# Altium PCB Z80 Card for Commodore C64.PcbDoc
Units mm, origin at the board's own origin, x right, y up, seen from the top; angles counter-clockwise.
Board outline 58.01 x 82.64 mm, 2 copper layers (Top Layer, Bottom Layer), stack 1.569 mm thick; 27 components, 81 nets, 239 pads, 91 vias.
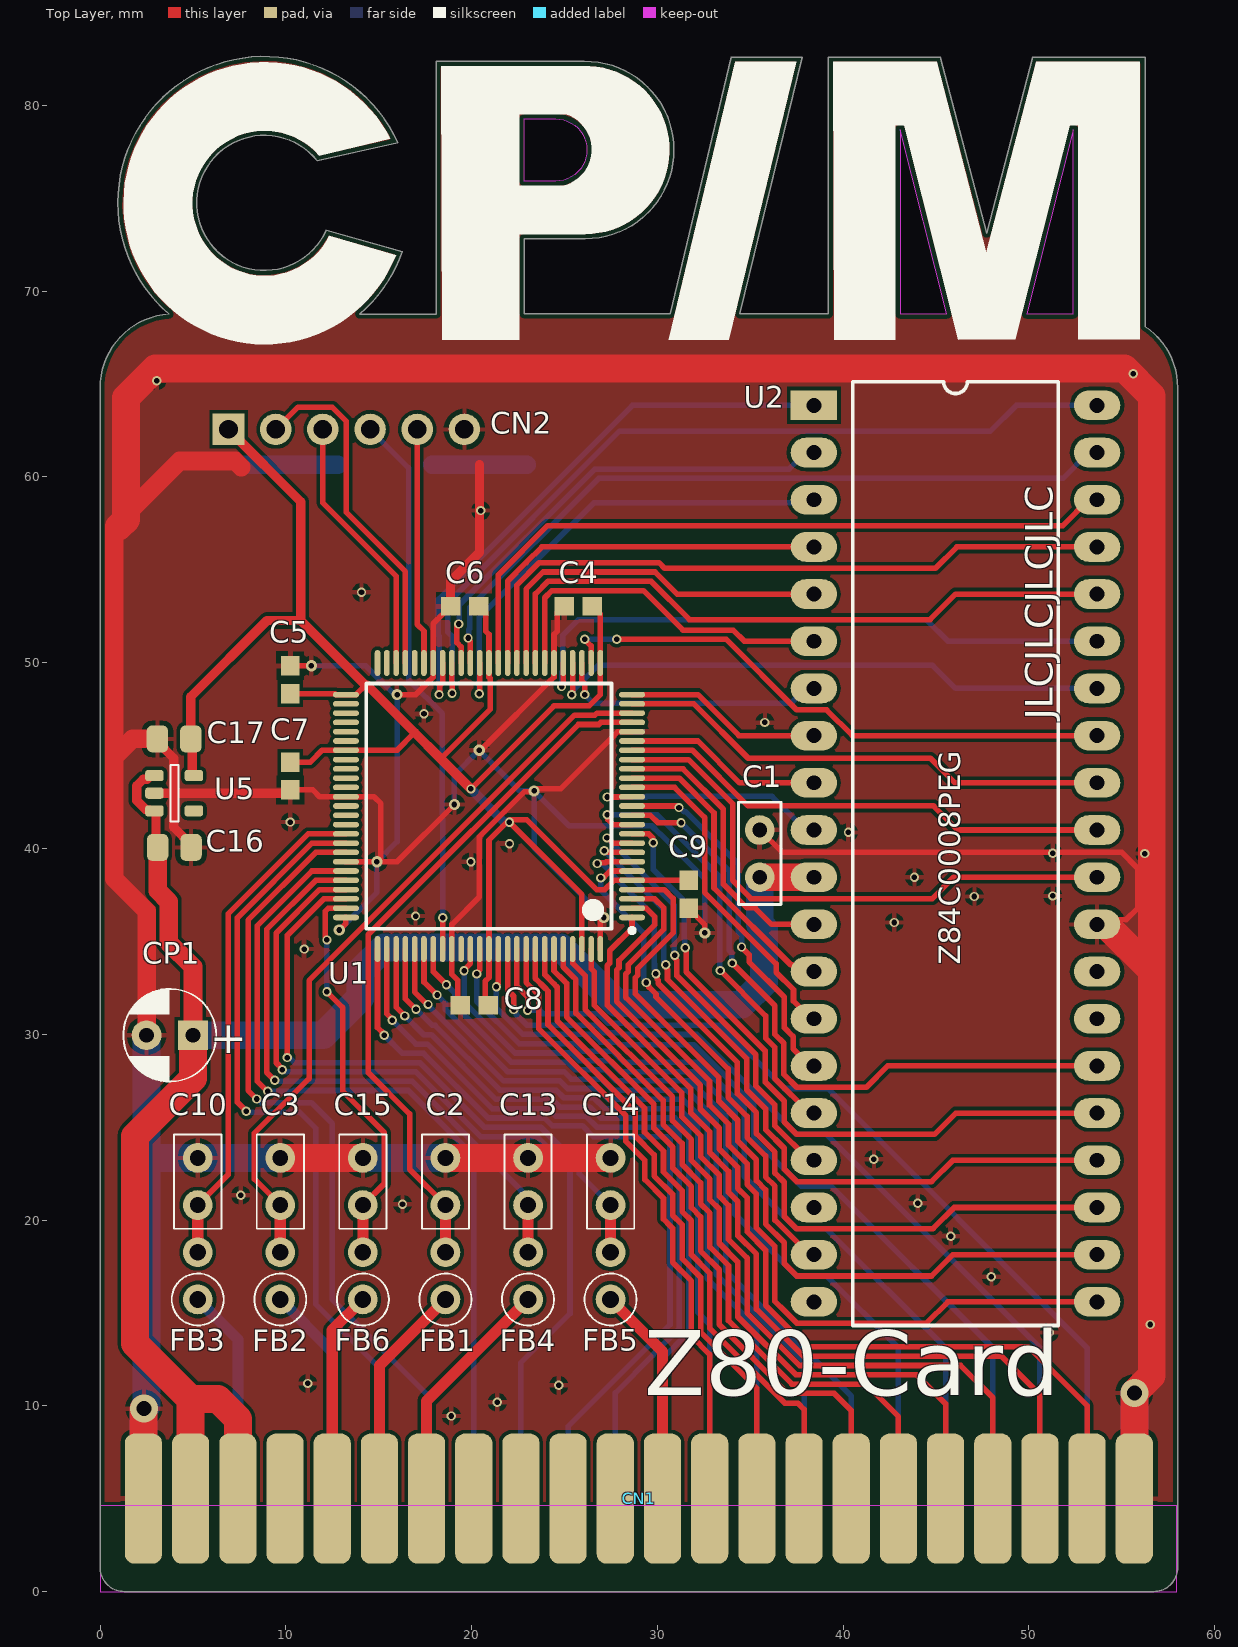
[diagram p0: Top Layer view]
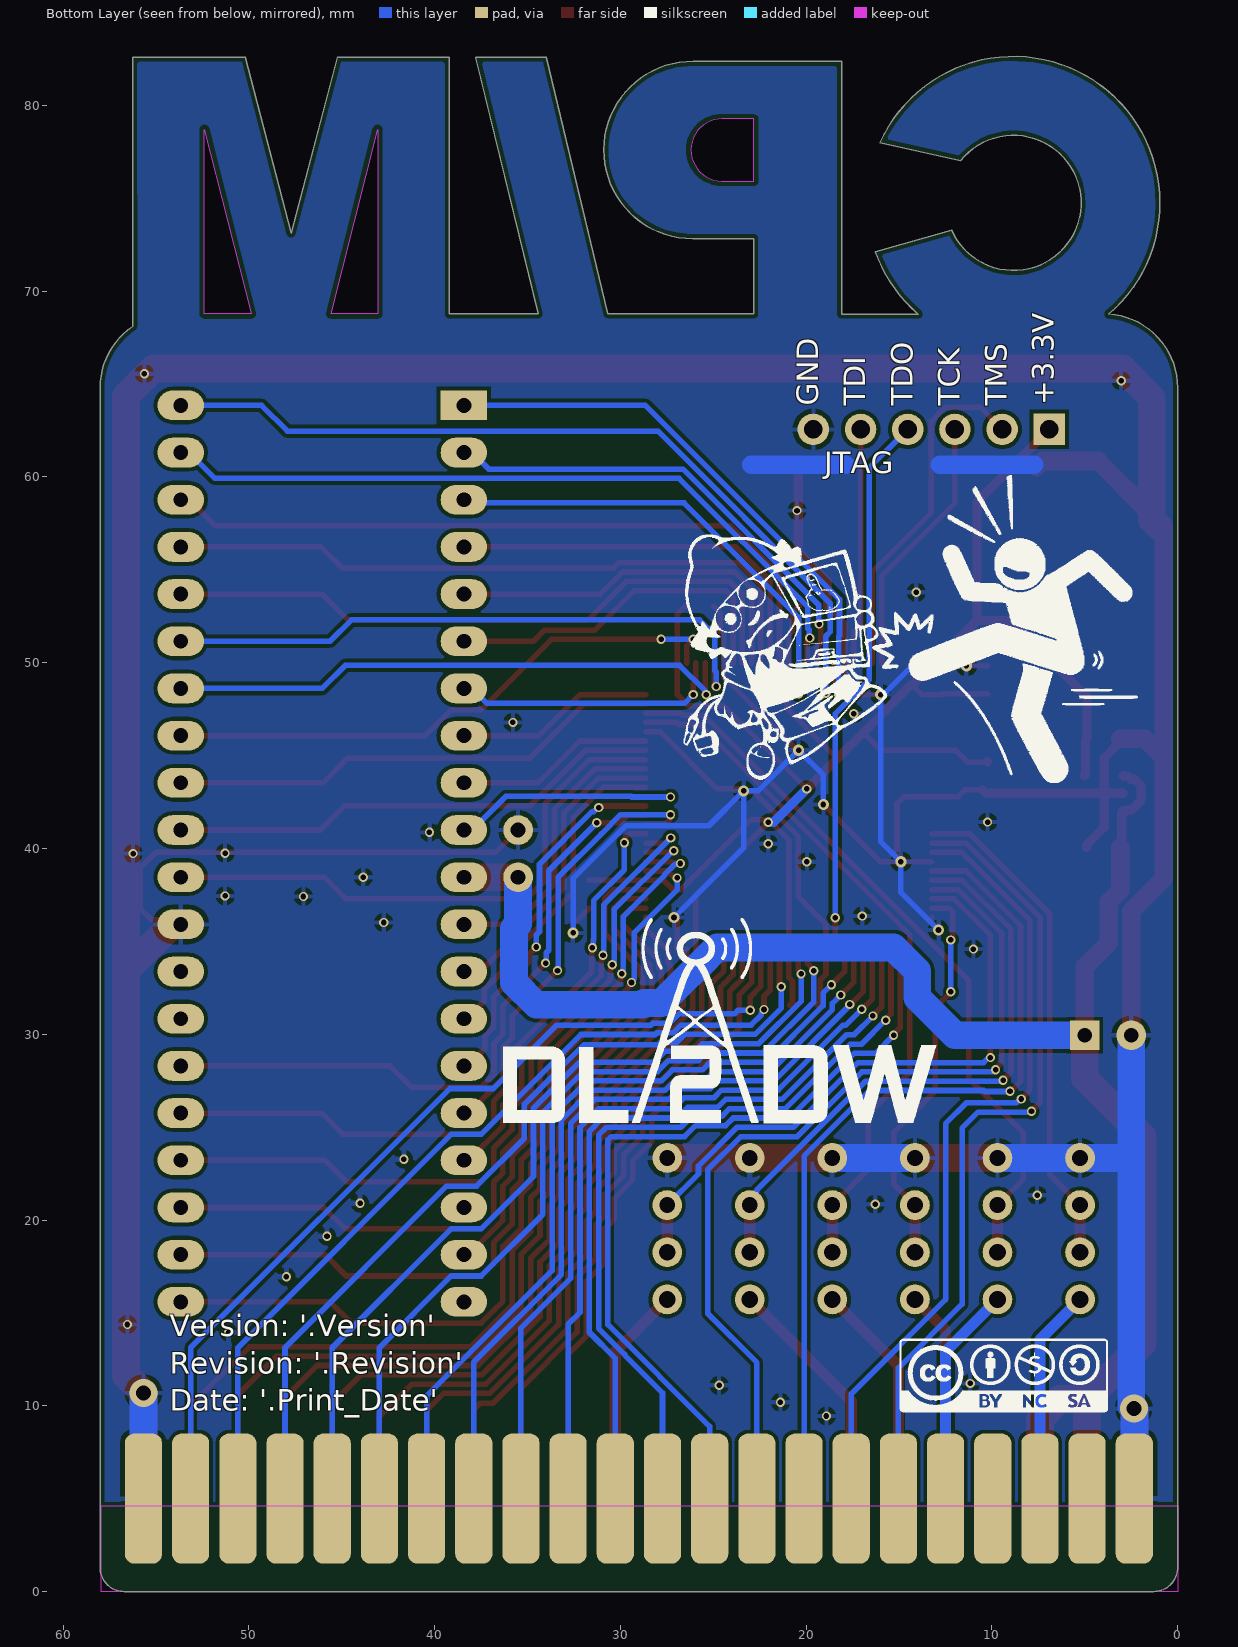
[diagram p1: Bottom Layer view, seen from below]
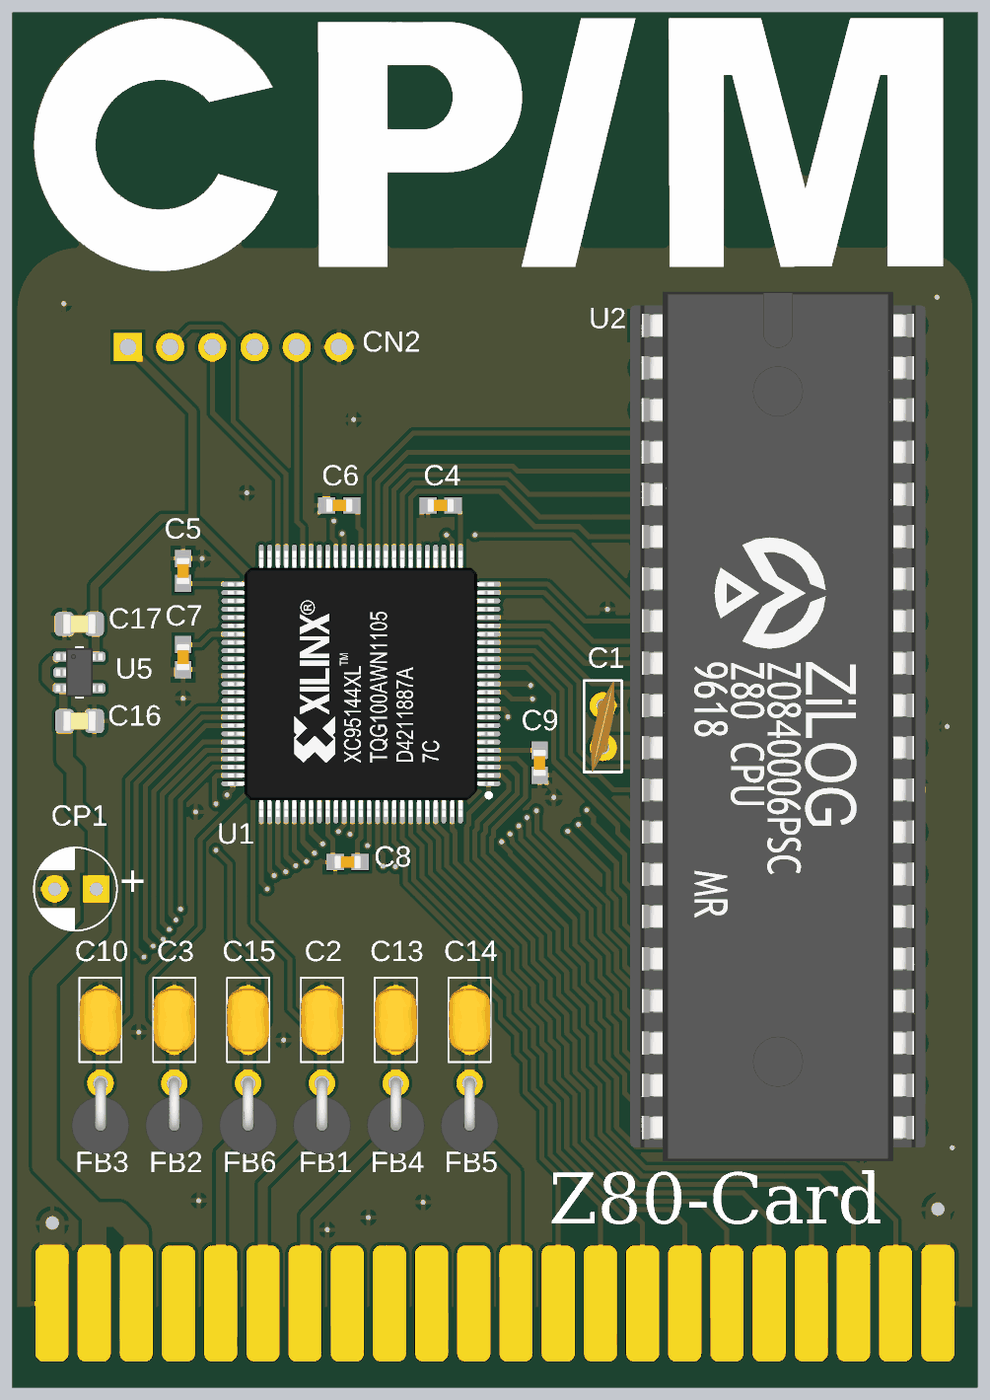
[diagram p2: 3D render of the assembled board from above, using the file's embedded part models]

## Layer stack, top to bottom
Top Solder: solder mask 0.0254, SM-001, Dk 4
Top Layer: signal copper 0.035
Dielectric 1: core 1.4986, Core-043, Dk 4.3
Bottom Layer: signal copper 0.035
Bottom Solder: solder mask 0.0254, SM-001, Dk 4

## Board outline
0,1.3 0,64.795 cw(c3.988,64.795) 3.71,68.773 cw(c8.843,74.756) 16.027,78.003 11.684,77.03 ccw(c8.842,74.757) 12.172,73.289 16.275,72.127 cw(c8.842,74.757) 13.977,68.773 18.091,68.773 18.091,82.376 26.076,82.375 cw(c26.12,77.6) 26.12,72.824 22.829,72.824 22.829,68.783 30.683,68.783 33.991,82.608 37.803,82.608 34.437,68.781 39.206,68.781 39.204,82.603 45.231,82.603 47.733,73.127 50.197,82.603 56.262,82.603 56.262,68.101 cw(c54.029,64.801) 58.014,64.795 58.014,1.296 cw(c56.718,1.296) 56.718,0 1.3,0 cw(c1.3,1.3)
cut-out: 22.829,75.928 22.829,79.271 24.519,79.271 cw(c24.535,77.6) 24.535,75.928
cut-out: 43.071,68.783 45.578,68.783 45.582,68.787 43.071,78.699
cut-out: 49.885,68.79 52.389,68.79 52.395,68.783 52.395,78.699

## Design rules (kind name [scope] priority, off if disabled: settings)
BoardOutlineClearance [All] p1: gap=0.254 ignorepadtopadclearanceinfootprint=FALSE
Clearance [All] p1: gap=0.2 ignorepadtopadclearanceinfootprint=TRUE
ComponentClearance ComponentClearance_Sheet [HasFootprint('PCB Title Block DIN A4')] p1: gap=0 collisioncheckmode=3 verticalgap=0 showdistances=FALSE
ComponentClearance [All] p2: gap=0.254 collisioncheckmode=3 verticalgap=0.254 showdistances=FALSE
MinimumSolderMaskSliver [All] p1: minsoldermaskwidth=0.103
PolygonConnect [All] p1: connectstyle=Relief reliefconductorwidth=0.254 reliefentries=4 polygonreliefangle="90 Angle" airgapwidth=0.254
RoutingVias RoutingVias_Power [(InNet('VCC') OR InNet('GND') OR InNet('+5V'))] p1: holewidth=0.8 width=1.5 viastyle="Through Hole" minholewidth=0.3 minwidth=0.6 maxholewidth=0.8 maxwidth=1.5
RoutingVias [All] p2: holewidth=0.4 width=0.7 viastyle="Through Hole" minholewidth=0.3 minwidth=0.5 maxholewidth=0.5 maxwidth=0.8
SilkToSilkClearance [All] p1: silktosilkclearance=0
SilkToSolderMaskClearance [IsPad] p1: minsilkscreentomaskgap=0.2 clearancetoexposedcopper=TRUE
SolderMaskExpansion [All] p1: expansion=0.038 istentingtop=FALSE
UnRoutedNet [All] p1: checkbadconnections=TRUE
Width Width_Power [(InNet('VCC') OR InNet('GND') OR InNet('+5V'))] p1: maxlimit=1.5 minlimit=0.3 preferedwidth=1 minimp=50.000000 maximp=50.000000 favimp=50.000000
Width [All] p2: maxlimit=0.6 minlimit=0.3 preferedwidth=0.4
25 further rules are at their usual default settings.

## Components (designator, comment, footprint, x,y, rotation, side; value= is the part's Value field where it differs from the comment)
C1 "100nF" "CAP Disc 100nF P2.54mm D5.5mm T3mm" 35.509,40.996 r270 top
C2 "10pF" "CAP CER 10PF 25V C0G-NP0 RADIAL Kemet C315C100J3G5TA" 18.593,23.343 r270 top
C3 "10pF" "CAP CER 10PF 25V C0G-NP0 RADIAL Kemet C315C100J3G5TA" 9.703,23.343 r270 top
C4 "0.1µF" "CAP 100nF SMD 0603 C0603C104J3RACTU" 25.742,53.035 r0 top
C5 "0.1µF" "CAP 100nF SMD 0603 C0603C104J3RACTU" 10.236,49.086 r270 top
C6 "0.1µF" "CAP 100nF SMD 0603 C0603C104J3RACTU" 19.634,53.035 r0 top
C7 "0.1µF" "CAP 100nF SMD 0603 C0603C104J3RACTU" 10.236,43.903 r90 top
C8 "0.1µF" "CAP 100nF SMD 0603 C0603C104J3RACTU" 20.142,31.572 r0 top
C9 "0.1µF" "CAP 100nF SMD 0603 C0603C104J3RACTU" 31.699,37.541 r90 top
C10 "10pF" "CAP CER 10PF 25V C0G-NP0 RADIAL Kemet C315C100J3G5TA" 5.258,23.343 r270 top
C13 "10pF" "CAP CER 10PF 25V C0G-NP0 RADIAL Kemet C315C100J3G5TA" 23.038,23.343 r270 top
C14 "10pF" "CAP CER 10PF 25V C0G-NP0 RADIAL Kemet C315C100J3G5TA" 27.483,23.343 r270 top
C15 "10pF" "CAP CER 10PF 25V C0G-NP0 RADIAL Kemet C315C100J3G5TA" 14.148,23.343 r270 top
C16 "10µF" "Kemet C0805CxxxK8RACTU Series H=1.4mm" 3.999,40.056 r180 top
C17 "10µF" "Kemet C0805CxxxK8RACTU Series H=1.4mm" 3.988,45.898 r0 top
CN1 "Expansion Port EDGE Connector" "C64 Expansion Port EDGE Connector" 2.337,5.004 r0 top locked
CN2 "JTAG" "Pin Header 01x06 2.54mm Horizontal Male" 6.914,62.559 r0 top
CP1 "47µF" "CAP 47µF16V D6mm H6.3mm P2.5mm" 5.004,29.947 r180 top
FB1 "2743005112" "Ferrite Bead Fair Rite 2743005112" 18.593,15.723 r90 top
FB2 "2743005112" "Ferrite Bead Fair Rite 2743005112" 9.703,15.723 r90 top
FB3 "2743005112" "Ferrite Bead Fair Rite 2743005112" 5.258,15.723 r90 top
FB4 "2743005112" "Ferrite Bead Fair Rite 2743005112" 23.038,15.723 r90 top
FB5 "2743005112" "Ferrite Bead Fair Rite 2743005112" 27.483,15.723 r90 top
FB6 "2743005112" "Ferrite Bead Fair Rite 2743005112" 14.148,15.723 r90 top
U1 "XC95144XL-10TQ100C" "TQFP-100 P0.5mm XC95144XL-7TQ100C" 20.936,42.287 r180 top
U2 "Z84C0008PEG" "Zilog Z80 CPU with Socket" 38.43,63.856 r0 top
U5 "SPX5205M5-L-3-3/TR" SOT-23-5 3.988,42.977 r270 top

## Footprints (in the part's own frame and the unit in brackets; to place one, negate y for a bottom-side part, rotate by r counter-clockwise, add the part's x,y. Pads: shape width x height; smd on the part's side, far side on the other; paste and mask are expansions set on the pad)
"C64 Expansion Port EDGE Connector" [mm] "C64 Expansion Port EDGE Connector"
  rrect50% 2x7 smd paste-1: 1(0,0) 2(2.54,0) 3(5.08,0) 4(7.62,0) 5(10.16,0) 6(12.7,0) 7(15.24,0) 8(17.78,0) 9(20.32,0) 10(22.86,0) 11(25.4,0) 12(27.94,0) 13(30.48,0) 14(33.02,0) 15(35.56,0) 16(38.1,0) 17(40.64,0) 18(43.18,0) 19(45.72,0) 20(48.26,0) 21(50.8,0) 22(53.34,0)
  rrect50% 2x7 smd far side paste-1: A(0,0) B(2.54,0) C(5.08,0) D(7.62,0) E(10.16,0) F(12.7,0) H(15.24,0) J(17.78,0) K(20.32,0) L(22.86,0) M(25.4,0) N(27.94,0) P(30.48,0) R(33.02,0) S(35.56,0) T(38.1,0) U(40.64,0) V(43.18,0) W(45.72,0) X(48.26,0) Y(50.8,0) Z(53.34,0)
"CAP 47µF16V D6mm H6.3mm P2.5mm" [mm]
  rect 1.6x1.6 hole 0.8: 1(0,0)
  round 1.6 hole 0.8: 2(2.5,0)
  silkscreen extent -1.25,-2.5 3.75,2.5, body extent -1.75,-3 4.25,3, height 6.89
"CAP 100nF SMD 0603 C0603C104J3RACTU" [mm] "Chip Capacitor, 2-Leads, Body 1,60x0,80mm, IPC Medium Density"
  rect 1.05x1 smd: 1(-0.75,0) 2(0.75,0)
  body extent -0.8,-0.4 0.8,0.4, height 0.87
"CAP CER 10PF 25V C0G-NP0 RADIAL Kemet C315C100J3G5TA" [mm]
  round 1.6 hole 0.85: 1(0,0) 2(2.54,0)
  silkscreen extent -1.27,-1.27 3.81,1.27, body extent -0.63,-1.27 3.17,1.27, height 3.39
"CAP Disc 100nF P2.54mm D5.5mm T3mm" [mm]
  round 1.6 hole 0.8: 1(0,0) 2(2.54,0)
  silkscreen extent -1.49,-1.14 4.01,1.14, body extent -1.49,-0.73 4.01,0.73, height 5.87
"Ferrite Bead Fair Rite 2743005112" [mm] "FERRITE BEAD AXIAL 1LN"
  round 1.6 hole 0.9: 1(0,0) 2(2.54,0)
  silkscreen extent -1.4,-1.4 1.4,1.4, body extent -1.75,-1.75 2.87,1.75, height 8.59
"Kemet C0805CxxxK8RACTU Series H=1.4mm" [mm]
  rrect50% 1.15x1.45 smd: 1(-0.9,0) 2(0.9,0)
  body extent -1,-0.62 1,0.62, height 1.4
"Pin Header 01x06 2.54mm Horizontal Male" [mm]
  rect 1.7x1.7 hole 1: 1(0,0)
  round 1.7 hole 1: 2(2.54,0) 3(5.08,0) 4(7.62,0) 5(10.16,0) 6(12.7,0)
SOT-23-5 [mm]
  rrect50% 0.6x1 smd: 1(-0.95,-1.06) 2(0,-1.06) 3(0.95,-1.06) 4(0.95,1.06) 5(-0.95,1.06)
  silkscreen extent -1.52,-0.2 1.52,0.23, body extent -1.45,-1.41 1.45,1.41, height 1.3
"TQFP-100 P0.5mm XC95144XL-7TQ100C" [mm] "TSQFP, 100-Leads, Body 14,00x14,00mm, Pitch 0,50mm, IPC Medium Density"
  oval 1.4x0.3 smd: 1(-7.7,6) 2(-7.7,5.5) 3(-7.7,5) 4(-7.7,4.5) 5(-7.7,4) 6(-7.7,3.5) 7(-7.7,3) 8(-7.7,2.5) 9(-7.7,2) 10(-7.7,1.5) 11(-7.7,1) 12(-7.7,0.5) 13(-7.7,0) 14(-7.7,-0.5) 15(-7.7,-1) 16(-7.7,-1.5) 17(-7.7,-2) 18(-7.7,-2.5) 19(-7.7,-3) 20(-7.7,-3.5) 21(-7.7,-4) 22(-7.7,-4.5) 23(-7.7,-5) 24(-7.7,-5.5) 25(-7.7,-6) 51(7.7,-6) 52(7.7,-5.5) 53(7.7,-5) 54(7.7,-4.5) 55(7.7,-4) 56(7.7,-3.5) 57(7.7,-3) 58(7.7,-2.5) 59(7.7,-2) 60(7.7,-1.5) 61(7.7,-1) 62(7.7,-0.5) 63(7.7,0) 64(7.7,0.5) 65(7.7,1) 66(7.7,1.5) 67(7.7,2) 68(7.7,2.5) 69(7.7,3) 70(7.7,3.5) 71(7.7,4) 72(7.7,4.5) 73(7.7,5) 74(7.7,5.5) 75(7.7,6)
  oval 0.3x1.4 smd: 26(-6,-7.7) 27(-5.5,-7.7) 28(-5,-7.7) 29(-4.5,-7.7) 30(-4,-7.7) 31(-3.5,-7.7) 32(-3,-7.7) 33(-2.5,-7.7) 34(-2,-7.7) 35(-1.5,-7.7) 36(-1,-7.7) 37(-0.5,-7.7) 38(0,-7.7) 39(0.5,-7.7) 40(1,-7.7) 41(1.5,-7.7) 42(2,-7.7) 43(2.5,-7.7) 44(3,-7.7) 45(3.5,-7.7) 46(4,-7.7) 47(4.5,-7.7) 48(5,-7.7) 49(5.5,-7.7) 50(6,-7.7) 76(6,7.7) 77(5.5,7.7) 78(5,7.7) 79(4.5,7.7) 80(4,7.7) 81(3.5,7.7) 82(3,7.7) 83(2.5,7.7) 84(2,7.7) 85(1.5,7.7) 86(1,7.7) 87(0.5,7.7) 88(0,7.7) 89(-0.5,7.7) 90(-1,7.7) 91(-1.5,7.7) 92(-2,7.7) 93(-2.5,7.7) 94(-3,7.7) 95(-3.5,7.7) 96(-4,7.7) 97(-4.5,7.7) 98(-5,7.7) 99(-5.5,7.7) 100(-6,7.7)
  silkscreen extent -7.83,-6.6 6.6,6.82, body extent -8.01,-8.01 8.01,8.01, height 1.5
"Zilog Z80 CPU with Socket" [mm]
  rect 2.5x1.6 hole 0.8: 1(0,0)
  oval 2.5x1.6 hole 0.8: 2(0,-2.54) 3(0,-5.08) 4(0,-7.62) 5(0,-10.16) 6(0,-12.7) 7(0,-15.24) 8(0,-17.78) 9(0,-20.32) 10(0,-22.86) 11(0,-25.4) 12(0,-27.94) 13(0,-30.48) 14(0,-33.02) 15(0,-35.56) 16(0,-38.1) 17(0,-40.64) 18(0,-43.18) 19(0,-45.72) 20(0,-48.26) 21(15.24,-48.26) 22(15.24,-45.72) 23(15.24,-43.18) 24(15.24,-40.64) 25(15.24,-38.1) 26(15.24,-35.56) 27(15.24,-33.02) 28(15.24,-30.48) 29(15.24,-27.94) 30(15.24,-25.4) 31(15.24,-22.86) 32(15.24,-20.32) 33(15.24,-17.78) 34(15.24,-15.24) 35(15.24,-12.7) 36(15.24,-10.16) 37(15.24,-7.62) 38(15.24,-5.08) 39(15.24,-2.54) 40(15.24,0)
  silkscreen extent 2.08,-49.53 13.16,1.27, body extent -1.27,-50.3 16.51,2.04, height 8.89

## Part data
C1: library part CMP-Capacitors-Ceramic_Capacitors-00007-4, "Ceramic Disc Capacitors 100nF -20%~+80% 50V Through Hole,P=2.54mm RoHS", ComponentLink1URL=https://lcsc.com/product-detail/Others_Dersonic-CC1H104ZA1PD3F5O3000_C353909.html
C2 C3 C10 C13 C14 C15: library part CMP-Capacitors-Ceramic_Capacitors-00049-1, "CAP CER 10PF 25V C0G/NP0 RADIAL"
C4 C5 C6 C7 C8 C9: library part CMP-Capacitors-Ceramic_Capacitors-00012-1, "KEMET         C0603C104J3RACTU             SMD Multilayer Ceramic Capacitor, 0603 [1608 Metric], 0.1 F, 25 V,  5%, X7R, C Series", Capacitance=100nF, Case Code (Imperial)=0603, Case Code (Metric)=1608, Dielectric=X7R, Dielectric Material=Ceramic, Max Operating Temperature=125°C, Min Operating Temperature=-55°C, Package Quantity=4000, Tolerance=5%, Voltage=25V, Case/Package=0603, Contact Plating=Tin,Matte, Depth=0.8mm, Height=0.8mm, Lead Pitch=0.7mm, Length=1.6mm, Mount="Surface Mount,PCB", Number of Pins=2, Packaging="Tape and Reel", Radiation Hardening=No, REACH SVHC="No SVHC", Termination=SMD/SMT, Thickness=0.034inch, Voltage Rating=25V, Voltage Rating (DC)=25V, Width=0.031inch
C16 C17: library part CMP-Capacitors-Ceramic_Capacitors-00016-2, "KEMET - C0805C106K8RACTU - CAP, 10µF, 10V, 10%, X7R, 0805", Capacitance=10uF, Case Code (Imperial)=0805, Case Code (Metric)=2012, Dielectric=X7R, Dielectric Material=Ceramic, Max Operating Temperature=125°C, Min Operating Temperature=-55°C, Package Quantity=1, Tolerance=10%, Voltage=10V, Case/Package=0805, Depth=1.25mm, Dissipation Factor=7.5%, Height=1.25mm, Length=2mm, Mount="Surface Mount,PCB", Packaging="Tape and Reel", REACH SVHC="No SVHC", Termination=SMD/SMT, Thickness=0.055inch, Voltage Rating=10V, Voltage Rating (DC)=10V, Width=1.2mm
CN1: library part CMP-Commodore-00008-4, "Expansion Port EDGE Connector for Interface Cards"
CN2: library part CMP-Connectors-Male_PIN_Headers-00005-2, "CONN HEADER VERT 6POS 2.54MM", Color=Black, Package Quantity=1, Connector Type="Male Pin", Contact Mating Length=0.318inch, Contact Plating=Gold, Mount="Through Hole", Number of Positions=6, Number of Rows=1, Packaging=Bulk, Pitch=0.1inch, Termination=Solder
CP1: library part CMP-Capacitors-Electrolyt_Capacitors00000-5, "Aluminum Electrolytic Capacitors - Leaded 47uF 105c", Capacitance=47uF, Case/Package=Radial, Max Operating Temperature=105°C, Min Operating Temperature=-55°C, Package Quantity=2000, Ripple Current=115mA, Tolerance=20%, Voltage Rating=16V, Height - Seated (Max)=0.236inch, Impedance=1.3R, Lead Pitch=0.098inch, Length=5mm, Life (Hours)=1000Hour, Mount="Through Hole", Packaging="Tape and Reel", Termination=Radial, Voltage Rating (DC)=16V
FB1 FB2 FB3 FB4 FB5 FB6: library part CMP-Inductors-00000-10, "Ferrite Beads Axial 91Ohm 100MHz T/R", Case/Package=Axial, Max Operating Temperature=125°C, Min Operating Temperature=-55°C, Package Quantity=4500, Test Frequency=100MHz, Diameter=3.5mm, Impedance=91R, Length=6mm, Packaging="Tape and Reel", Shielding=Unshielded, Termination=Axial
U1: library part CMP-ICs-CPLD_FPGA-00000-1, "IC CPLD 144MC 7.5NS 100TQFP", Case/Package=LQFP, Max Frequency=125MHz, Max Operating Temperature=70°C, Max Supply Voltage=3.6V, Min Operating Temperature=0°C, Min Supply Voltage=3V, Operating Supply Voltage=3.3V, Package Quantity=90, Contact Plating=Tin,Lead, Lead Free="Contains Lead", Memory Type=FLASH, Mount="Surface Mount", Number of Gates=3200, Number of I/Os=81, Number of Logic Blocks (LABs)=8, Number of Logic Elements/Cells=8, Number of Macrocells=144, Number of Pins=100, Packaging=Tray, Propagation Delay=7.5ns, Speed Grade=7, Turn-On Delay Time=7.5ns
U2: library part CMP-ICs-00009-1, "IC MPU Z80 8MHZ 40DIP", Case/Package=DIP, Frequency=8MHz, Max Operating Temperature=100°C, Max Supply Voltage=5V, Min Operating Temperature=-40°C, Min Supply Voltage=4.5V, Package Quantity=10, Core Architecture=Z8, Data Bus Width=8b, Height=4.19mm, Lead Free="Lead Free", Length=62.74mm, Max Frequency=8MHz, Memory Size=64KB, Memory Type=ROMless, Mount="Through Hole", Number of I/Os=24, Number of Pins=40, Packaging=Rail/Tube, Radiation Hardening=No, REACH SVHC=Unknown, Voltage=5V, Width=14.22mm
U5: library part CMP-ICs-Power_Supply-00002-2, "LDO Regulator Pos 3.3V 0.15A 5-Pin SOT-23 T/R", Case/Package=SOT-23, Dropout Voltage=210mV, Max Input Voltage=16V, Max Operating Temperature=125°C, Max Output Current=150mA, Min Input Voltage=2.5V, Min Operating Temperature=-40°C, Min Output Voltage=3.3V, Quiescent Current=1uA, Accuracy=1%, Height=1.15mm, Lead Free="Lead Free", Length=2.9mm, Mount="Surface Mount", Number of Outputs=1, Number of Pins=5, Number of Regulators=1, Output Current=150mA, Output Type=Fixed, Output Voltage=3.3V, Packaging="Tape and Reel", Polarity=Positive, Radiation Hardening=No, Width=1.6mm

## Via types
v1: diameter 0.5, hole 0.3, Top Layer to Bottom Layer, tented both sides, 80 vias
v2: diameter 0.6, hole 0.3, Top Layer to Bottom Layer, tented both sides, 9 vias
v3: diameter 1.5, hole 0.8, Top Layer to Bottom Layer, tented both sides, 2 vias

## Nets (pads, with @x,y where several pads share a name; then routed paths per layer and width w, separated by ;. In a path a pad name is that pad's centre, name@x,y a point inside that pad or via, vN(x,y) a via of type N, cw(c..) or ccw(c..) an arc to the next point about the centre after c; other vN are vias at no path point)
+3V3: C4.2 C5.2 C6.2 C7.2 C8.2 C9.2 C17.2 CN2.1 U1.5 U1.26 U1.38 U1.51 U1.57 U1.88 U1.98 U5.5 | length 105.3
  Top Layer w0.3: C7.2 11.319,44.653 11.953,45.287 U1.57 15.99,45.287 16.936,46.234 ; C5.2 12.637,48.336 12.686,48.287 U1.51 13.786,48.287 14.287,48.788 14.382,48.788 ; 18.248,44.921 18.429,44.921 21.009,47.501 21.009,49.157 20.936,49.23 U1.38 20.936,51.523 20.759,51.7 20.759,52.685 20.409,53.035 C6.2 ; v1(19.964,43.205) 24.435,47.676 26.323,47.676 26.434,47.787 26.436,47.787 26.936,48.287 U1.26 26.936,52.616 26.517,53.035 C4.2 ; C8.2 20.736,31.728 20.736,32.857 20.936,33.057 20.936,40.452 22.039,41.554 22.966,41.554 26.733,37.787 27.17,37.787 27.67,38.287 U1.5 30.266,38.287 30.27,38.291 C9.2 ; v1(22.038,41.412) 25.936,37.513 U1.98
  Top Layer w0.5: U5.5 5.018,43.927 4.968,43.977 4.968,45.818 C17.2 4.888,48.169 8.992,52.273 10.801,52.273 ; CN2.1 10.801,58.672 10.801,52.273 ; C7.2 C7.2@10.236,44.678 ; 14.287,48.788 10.801,52.273 ; 14.382,48.788 16.936,46.234 18.248,44.921 v1(19.964,43.205)
  Bottom Layer w0.5: v1(19.964,43.205) 21.758,41.412 v1(22.038,41.412)
A0: CN1.Y U1.91 | length 49.3
  Top Layer w0.3: U1.91 22.436,33.019 22.436,32.795 22.436,32.587 23.012,32.011 v1(23.012,31.297)
  Bottom Layer w0.3: v1(23.012,31.297) 23.658,31.297 23.862,31.093 26.839,31.093 27.35,30.581 28.267,30.581 28.361,30.487 33.432,30.487 36.838,27.081 39.181,27.081 53.137,13.125 CN1.Y
A1: CN1.X U1.90 | length 47.5
  Top Layer w0.3: U1.90 21.936,32.812 21.936,32.587 21.936,32.38 22.271,32.046 v1(22.271,31.332)
  Bottom Layer w0.3: v1(22.271,31.332) 22.271,31.278 22.412,31.136 22.412,31.049 22.969,30.493 26.731,30.493 27.143,30.081 28.027,30.081 28.122,29.987 32.123,29.987 36.648,25.461 37.504,24.606 39.117,24.606 50.597,13.125 CN1.X
A2: CN1.W U1.89 | length 46.7
  Top Layer w0.3: v1(21.336,32.563) 21.336,32.617 21.436,32.717 U1.89
  Bottom Layer w0.3: v1(21.336,32.563) 21.336,31.418 22.762,29.993 26.524,29.993 26.936,29.581 27.82,29.581 27.963,29.439 31.964,29.439 35.179,26.223 35.179,24.39 37.744,21.826 39.357,21.826 48.057,13.125 CN1.W
A3: CN1.V U1.87 | length 46.1
  Top Layer w0.3: v1(20.277,33.246) 20.277,33.3 20.436,33.459 U1.87
  Bottom Layer w0.3: v1(20.277,33.246) 20.277,31.77 22.554,29.493 25.585,29.493 25.996,29.081 27.613,29.081 28.202,28.493 32.203,28.493 34.679,26.016 34.679,22.35 37.504,19.526 39.117,19.526 45.517,13.125 CN1.V
A4: CN1.U U1.86 | length 45.4
  Top Layer w0.3: v1(19.594,33.411) 19.594,33.465 19.936,33.808 U1.86
  Bottom Layer w0.3: v1(19.594,33.411) 19.594,31.746 22.347,28.993 25.378,28.993 25.789,28.581 27.406,28.581 27.995,27.993 31.996,27.993 34.179,25.809 34.179,20.31 37.504,16.986 39.117,16.986 42.977,13.125 CN1.U
A5: CN1.T U1.82 | length 44
  Top Layer w0.3: U1.82 17.936,33.372 v1(18.644,32.664)
  Bottom Layer w0.3: v1(18.644,32.664) 19.094,32.214 19.094,31.539 22.14,28.493 25.171,28.493 25.582,28.081 27.199,28.081 27.788,27.493 31.788,27.493 33.679,25.602 33.679,17.273 40.437,10.516 CN1.T
A6: CN1.S U1.81 | length 43.1
  Top Layer w0.3: U1.81 17.436,32.805 18.129,32.113 v1(18.142,32.113)
  Bottom Layer w0.3: v1(18.142,32.113) 18.594,31.661 18.594,31.332 21.933,27.993 24.964,27.993 25.375,27.581 26.992,27.581 27.58,26.993 31.581,26.993 33.179,25.395 33.179,17.066 37.897,12.349 CN1.S
A7: CN1.R U1.80 | length 42.3
  Top Layer w0.3: U1.80 16.936,32.279 17.608,31.607 v1(17.658,31.607)
  Bottom Layer w0.3: v1(17.658,31.607) 17.658,31.56 21.726,27.493 24.757,27.493 25.168,27.081 26.785,27.081 27.373,26.493 31.374,26.493 32.679,25.188 32.679,16.859 35.357,14.181 CN1.R
A8: CN1.P U1.79 | length 41.5
  Top Layer w0.3: U1.79 16.436,31.9 16.984,31.352 v1(17.006,31.352)
  Bottom Layer w0.3: v1(17.006,31.352) 17.885,30.473 18.038,30.473 21.519,26.993 24.55,26.993 24.961,26.581 26.578,26.581 27.166,25.993 31.167,25.993 32.179,24.981 32.179,15.026 32.817,14.389 CN1.P
A9: CN1.N U1.78 | length 42
  Top Layer w0.3: U1.78 15.936,31.46 v1(16.408,30.988)
  Bottom Layer w0.3: v1(16.408,30.988) 17.423,29.973 17.831,29.973 21.312,26.493 24.343,26.493 24.754,26.081 26.37,26.081 26.959,25.493 28.871,25.493 30.96,25.493 31.679,24.774 31.679,13.958 30.277,12.556 CN1.N
A10: CN1.M U1.77 | length 43
  Top Layer w0.3: U1.77 15.436,31.1 15.723,30.814 v1(15.723,30.759)
  Bottom Layer w0.3: v1(15.723,30.759) 17.009,29.473 17.624,29.473 21.105,25.993 24.135,25.993 24.547,25.581 26.163,25.581 26.752,24.993 28.664,24.993 30.753,24.993 31.179,24.567 31.179,14.165 29.777,12.763 29.777,12.733 27.737,10.693 CN1.M
A11: CN1.L U1.76 | length 44.1
  Top Layer w0.3: U1.76 14.936,30.362 15.297,30.001 v1(15.297,29.947)
  Bottom Layer w0.3: v1(15.297,29.947) 16.27,28.973 17.417,28.973 20.898,25.493 23.928,25.493 24.34,25.081 25.956,25.081 26.545,24.493 30.503,24.493 30.679,24.317 30.679,14.372 25.197,8.89 CN1.L
A12: CN1.K U1.72 | length 48.7
  Top Layer w0.3: v1(9.804,28.092) 9.804,28.147 9.484,28.467 9.484,35.452 11.819,37.787 U1.72
  Bottom Layer w0.3: v1(9.804,28.092) 9.859,28.092 9.978,27.973 17.003,27.973 20.483,24.493 23.514,24.493 25.298,22.708 25.298,14.961 22.657,12.319 CN1.K
A13: CN1.J U1.70 | length 46.2
  Top Layer w0.3: v1(9.03,26.927) 9.007,26.927 8.466,27.467 8.466,35.848 11.405,38.787 U1.70
  Bottom Layer w0.3: v1(9.03,26.927) 9.037,26.919 10.385,26.919 10.439,26.973 16.588,26.973 20.117,23.445 CN1.J
A14: CN1.H U1.68 | length 43.5
  Top Layer w0.3: v1(8.43,26.515) 7.966,26.978 7.966,36.141 11.612,39.787 U1.68
  Bottom Layer w0.3: v1(8.43,26.515) 8.484,26.515 8.684,26.314 11.379,26.314 12.497,25.197 12.497,15.723 17.577,10.643 CN1.H
A15: CN1.F U1.67 | length 43.6
  Top Layer w0.3: v1(7.874,25.857) 7.391,26.34 7.391,36.274 11.405,40.287 U1.67
  Bottom Layer w0.3: v1(7.874,25.857) 7.925,25.806 10.744,25.806 11.608,24.943 11.608,15.469 15.037,12.04 CN1.F
B\U\S\A\C\K\: U1.7 U2.23 | length 42.8
  Top Layer w0.3: v1(26.772,39.192) 26.81,39.23 27.199,39.23 27.256,39.287 27.421,39.287 U1.7 ; v1(29.923,33.257) 29.962,33.219 29.962,33.074 29.983,33.052 29.983,32.966 30.045,32.905 30.045,32.746 34.308,28.482 34.308,26.805 35.33,25.784 35.33,24.658 36.33,23.658 36.33,22.532 36.83,22.032 36.83,20.613 36.83,20.199 37.504,19.526 37.83,19.526 42.705,19.526 42.712,19.533 44.839,19.533 45.982,20.676 U2.23
  Bottom Layer w0.3: v1(26.772,39.192) 26.81,39.154 27.063,39.154 27.618,38.599 27.618,38.549 29.838,36.329 29.838,33.785 29.845,33.778 29.845,33.499 29.885,33.459 29.885,33.296 v1(29.923,33.257)
B\U\S\R\Q\: U1.10 U2.25 | length 37
  Top Layer w0.3: U1.10 29.537,40.787 29.748,40.577 29.748,40.343 v1(29.786,40.305) ; v1(31.507,34.659) 31.545,34.621 31.545,33.367 35.808,29.104 35.808,27.427 36.83,26.405 36.83,25.279 37.504,24.606 44.921,24.606 46.071,25.756 U2.25
  Bottom Layer w0.3: v1(29.786,40.305) 29.786,38.854 31.445,37.195 31.445,35.108 31.468,35.085 31.468,34.698 v1(31.507,34.659)
BA: C14.2 FB5.2 U1.73 | length 34
  Top Layer w0.3: v1(10.084,28.747) 10.084,35.331 12.04,37.287 U1.73
  Top Layer w0.6: FB5.2 C14.2
  Bottom Layer w0.3: v1(10.084,28.747) 10.184,28.747 10.457,28.473 17.21,28.473 20.69,24.993 23.721,24.993 25.798,22.915 25.798,22.487 C14.2
CLK: U1.32 U2.6 | length 19.3
  Top Layer w0.3: U1.32 23.936,53.499 24.322,53.885 29.253,53.885 31.381,51.757 34.08,51.757 34.681,51.156 U2.6
D0: CN1.21 U1.2 | length 51
  Top Layer w0.3: U1.2 29.393,36.787 29.849,36.331 29.849,35.891 27.936,33.978 27.936,33.581 27.805,33.45 27.805,31.772 32.309,27.269 32.309,25.977 33.33,24.955 33.33,23.83 34.33,22.83 34.33,21.704 34.83,21.204 34.83,19.371 35.83,18.371 35.83,15.412 38.074,13.168 49.976,13.168 53.137,10.008 CN1.21
D1: CN1.20 U1.1 | length 47.7
  Top Layer w0.3: U1.1 28.636,35.703 27.436,34.503 27.436,33.83 27.305,33.699 27.305,31.565 31.809,27.061 31.809,25.77 32.83,24.748 32.83,23.622 33.83,22.622 33.83,21.497 34.33,20.997 34.33,19.164 35.33,18.164 35.33,15.205 37.867,12.668 48.521,12.668 50.597,10.592 CN1.20
D2: CN1.19 U1.99 | length 43.6
  Top Layer w0.3: U1.99 26.436,33.537 26.612,33.361 26.612,31.55 31.309,26.854 31.309,25.563 32.33,24.541 32.33,23.415 33.33,22.415 33.33,21.29 33.83,20.79 33.83,18.957 34.83,17.957 34.83,14.998 37.66,12.168 46.328,12.168 48.057,10.439 CN1.19
D3: CN1.18 U1.97 | length 41.7
  Top Layer w0.3: U1.97 25.436,34.037 25.436,33.83 25.936,33.33 26.112,33.154 26.112,31.343 30.809,26.647 30.809,25.356 31.83,24.334 31.83,23.208 32.83,22.208 32.83,21.082 33.33,20.582 33.33,18.75 34.33,17.75 34.33,14.791 37.453,11.668 43.958,11.668 45.517,10.109 CN1.18
D4: CN1.17 U1.96 | length 39.4
  Top Layer w0.3: U1.96 24.936,33.83 24.936,33.623 25.436,33.123 25.612,32.947 25.612,31.136 30.309,26.44 30.309,25.149 31.33,24.127 31.33,23.001 32.33,22.001 32.33,20.875 32.83,20.375 32.83,18.542 33.83,17.542 33.83,14.584 37.246,11.168 41.232,11.168 42.977,9.423 CN1.17
D5: CN1.16 U1.95 | length 37.7
  Top Layer w0.3: U1.95 24.436,33.623 24.436,33.416 24.936,32.916 25.112,32.74 25.112,30.929 29.809,26.233 29.809,24.942 30.83,23.92 30.83,22.794 31.83,21.794 31.83,20.668 32.33,20.168 32.33,18.335 33.33,17.335 33.33,14.377 37.039,10.668 39.522,10.668 40.437,9.754 CN1.16
D6: CN1.15 U1.94 | length 35.8
  Top Layer w0.3: U1.94 23.936,33.64 23.936,33.416 23.936,33.209 24.436,32.709 24.612,32.533 24.612,30.722 29.309,26.026 29.309,24.734 30.33,23.713 30.33,22.587 31.33,21.587 31.33,20.461 31.83,19.961 31.83,18.128 32.83,17.128 32.83,14.17 36.865,10.135 37.567,10.135 37.897,9.804 CN1.15
D7: CN1.14 U1.93 | length 34.5
  Top Layer w0.3: U1.93 23.436,33.433 23.436,33.209 23.436,33.002 23.936,32.502 24.112,32.325 24.112,30.515 28.809,25.819 28.809,24.527 29.83,23.506 29.83,22.38 30.83,21.38 30.83,20.254 31.33,19.754 31.33,17.921 32.33,16.921 32.33,13.962 35.357,10.936 CN1.14
D\M\A\: CN1.13 U1.92 | length 33.7
  Top Layer w0.3: U1.92 22.936,33.226 22.936,33.002 22.936,32.795 23.436,32.295 23.612,32.118 23.612,30.308 28.309,25.612 28.309,24.23 29.33,23.208 29.33,22.173 30.33,21.173 30.33,20.047 30.711,19.666 30.83,19.547 30.83,17.714 31.83,16.714 31.83,13.755 32.817,12.769 CN1.13
"DOT Clk": C2.2 FB1.2 U1.22 | length 37.8
  Top Layer w0.3: C2.2 16.662,22.733 16.662,25.712 14.436,27.938 14.436,35.366 25.746,46.676 26.848,46.676 26.959,46.787 U1.22
  Top Layer w0.6: FB1.2 C2.2
GND: C1.1 C2.1 C3.1 C4.1 C5.1 C6.1 C7.1 C8.1 C9.1 C10.1 C13.1 C14.1 C15.1 C16.1 C17.1 CN1.1 CN1.22 CN1.A CN1.Z CN2.6 CP1.2 U1.21 U1.31 U1.44 U1.62 U1.69 U1.75 U1.84 U1.100 U2.29 U5.2 | length 391.3
  Top Layer w0.3: C5.1 11.378,49.836 v2(11.379,49.835) ; C7.1@10.49,43.153 11.453,43.153 11.819,42.787 U1.62 14.744,42.787 15.113,42.418 15.113,39.497 v2(14.903,39.287) ; v2(12.878,35.611) 13.236,35.969 U1.75 ; U1.69 v2(14.903,39.287) ; v2(15.99,48.287) 16.993,48.287 17.936,49.23 U1.44 17.936,52.112 C6.1@18.859,53.035 ; v2(19.075,42.367) 15.995,39.287 v2(14.903,39.287) ; C8.1 19.244,31.721 19.244,32.913 18.936,33.22 U1.84 18.936,35.918 20.421,37.403 20.421,40.643 22.824,43.046 23.311,43.046 v2(23.368,43.104) 23.47,43.205 24.797,43.205 27.879,46.287 U1.21 ; v2(20.409,45.287) 20.493,45.287 24.436,49.23 U1.31 24.436,51.521 24.617,51.702 24.617,52.685 24.967,53.035 C4.1 ; U1.100 26.936,36.105 v2(27.118,36.287) ; C9.1 31.699,36.766 32.549,35.916 v2(32.549,35.457) ; C1.1 36.703,39.802 54.991,39.802 55.855,38.938 55.855,36.779 55.24,36.164 53.919,36.164 U2.29
  Top Layer w0.5: U5.2 3.937,42.977 ; C17.1 3.088,45.738 3.962,44.863 3.962,43.003 3.937,42.977 ; C16.1 4.899,40.206 3.962,41.142 3.962,42.977 ; C7.1@10.49,43.153 10.314,42.977 3.962,42.977 ; C6.1@18.859,53.035 18.859,54.385 20.422,55.948 20.422,60.655 ; 3.937,42.977 3.962,42.977
  Top Layer w1: 0.879,57.445 0.754,57.32 0.754,44.907 ; 1.397,57.963 4.293,60.858 7.272,60.858 7.598,60.532 ; CP1.2 2.504,36.633 0.754,38.383 0.754,44.907 ; C17.1 1.745,45.898 0.754,44.907
  Top Layer w1.5: 1.004,57.32 1.397,57.713 1.397,57.963 1.397,64.262 2.972,65.837 55.143,65.837 56.617,64.364 56.617,33.419 ; CN1.1 2.337,9.83 v3(2.362,9.855) ; C3.1 C15.1 ; C2.1 C13.1 C14.1 ; U2.29 54.12,35.916 56.617,33.419 ; CN1.22 v3(55.677,10.693) 56.617,11.633 56.617,33.419
  Bottom Layer w0.3: v2(11.379,49.835) 14.3,49.835 15.848,48.287 v2(15.99,48.287) 15.99,40.374 v2(14.903,39.287) 14.903,37.636 v2(12.878,35.611) ; v2(19.075,42.367) 19.075,43.953 v2(20.409,45.287) 22.593,43.104 v2(23.368,43.104) ; v2(27.118,36.287) 23.368,40.037 v2(23.368,43.104) ; v2(32.549,35.457) 32.549,38.39 30.139,40.8 30.124,40.8 29.701,41.224 25.248,41.224 v2(23.368,43.104)
  Bottom Layer w1: 7.722,60.655 10.262,60.655 12.802,60.655 ; 17.882,60.655 20.422,60.655 22.962,60.655
  Bottom Layer w1.5: CN1.A 2.337,9.83 v3(2.362,9.855) 2.504,9.997 2.504,23.343 ; CP1.2 2.504,23.343 ; C3.1 C10.1 2.504,23.343 ; C15.1 C2.1 ; CN1.Z v3(55.677,10.693)
  other v1: 18.911,9.449 21.387,10.185 24.689,11.1 11.176,11.201 51.097,13.949 56.54,14.376 47.981,16.942 45.796,19.126 16.281,20.853 44.018,20.904 7.569,21.336 41.656,23.266 10.997,34.587 42.748,36.017 16.984,36.361 47.066,37.414 51.283,37.447 43.84,38.456 19.964,39.287 56.236,39.726 51.283,39.751 22.039,40.257 40.284,40.869 10.236,41.424 35.789,46.787 17.436,47.249 14.072,53.789 20.498,58.191 3.048,65.176 55.626,65.557
I\/\O\1\: C13.2 FB4.2 U1.71 | length 32.9
  Top Layer w0.3: v1(9.403,27.519) 8.966,27.956 8.966,34.976 8.984,34.993 8.984,35.659 11.612,38.287 U1.71
  Top Layer w0.6: FB4.2 C13.2
  Bottom Layer w0.3: v1(9.403,27.519) 9.441,27.481 9.638,27.481 9.646,27.473 16.795,27.473 21.24,23.029 22.668,21.601 22.668,21.524 23.038,21.154 C13.2
I\N\T\: U1.11 U2.16 | length 24.1
  Top Layer w0.3: v1(27.305,41.824) 27.343,41.786 27.343,41.55 27.606,41.287 U1.11 ; v1(33.389,33.428) 35.83,30.987 35.83,29.789 36.308,29.311 36.308,27.634 38.187,25.756 U2.16
  Bottom Layer w0.3: v1(27.305,41.824) 29.989,41.824 31.027,40.786 33.359,38.454 33.359,33.458 v1(33.389,33.428)
L_A0: U1.18 U2.30 | length 31
  Top Layer w0.3: U1.18 31.677,44.787 34.049,42.415 34.049,38.289 35.033,37.306 44.807,37.306 45.957,38.456 U2.30
L_A1: U1.19 U2.31 | length 26.8
  Top Layer w0.3: U1.19 31.884,45.287 34.88,42.291 44.865,42.291 46.16,40.996 U2.31
L_A2: U1.24 U2.32 | length 26.8
  Top Layer w0.3: U1.24 31.964,47.787 34.895,44.856 44.699,44.856 46.02,43.536 U2.32
L_A3: U1.27 U2.33 | length 31.1
  Top Layer w0.3: v1(26.086,51.26) 26.436,50.909 U1.27 ; v1(27.813,51.257) 33.712,51.257 37.504,47.466 39.117,47.466 40.507,46.076 U2.33
  Bottom Layer w0.3: v1(26.086,51.26) 27.81,51.26 v1(27.813,51.257)
L_A4: U1.29 U2.34 | length 31.3
  Top Layer w0.3: v1(25.386,48.276) 25.424,48.314 25.424,48.451 25.444,48.471 25.444,48.808 25.436,48.816 25.436,48.975 U1.29
  Bottom Layer w0.3: v1(25.386,48.276) 25.424,48.314 25.424,48.474 26.81,49.86 44.814,49.86 46.058,48.616 U2.34
L_A5: U1.30 U2.35 | length 33.7
  Top Layer w0.3: v1(24.844,48.719) 24.844,48.773 24.936,48.865 U1.30
  Bottom Layer w0.3: v1(24.844,48.719) 24.844,49.496 24.917,49.569 24.917,51.486 25.737,52.306 44.487,52.306 45.637,51.156 U2.35
L_A6: U1.33 U2.36 | length 35.7
  Top Layer w0.3: U1.33 23.436,53.706 24.115,54.385 29.667,54.385 31.729,52.324 44.687,52.324 46.058,53.696 U2.36
L_A7: U1.35 U2.37 | length 36.5
  Top Layer w0.3: U1.35 22.436,51.26 22.436,54.178 23.643,55.385 30.084,55.385 30.384,55.086 44.972,55.086 46.122,56.236 U2.37
L_A8: U1.37 U2.38 | length 38.7
  Top Layer w0.3: U1.37 21.436,54.727 24.094,57.386 51.83,57.386 53.22,58.776 U2.38
L_A9: U1.40 U2.39 | length 40.3
  Top Layer w0.3: v1(19.809,51.333) 19.809,51.279 19.936,51.152 U1.40
  Bottom Layer w0.3: v1(19.809,51.333) 19.847,51.372 19.847,51.774 19.909,51.836 19.909,52.989 26.845,59.926 51.83,59.926 53.22,61.316 U2.39
L_A10: U1.42 U2.40 | length 46
  Top Layer w0.3: U1.42 18.936,48.937 18.948,48.925 v1(18.948,48.351)
  Bottom Layer w0.3: v1(18.948,48.351) 18.948,51.424 18.709,51.663 18.709,53.204 27.971,62.466 47.93,62.466 49.32,63.856 U2.40
L_A11: U1.43 U2.1 | length 31.5
  Top Layer w0.3: v1(18.248,48.285) 18.287,48.324 18.287,48.788 18.436,48.937 U1.43
  Bottom Layer w0.3: v1(18.248,48.285) 18.248,51.417 18.209,51.456 18.209,53.411 28.654,63.856 U2.1
L_A12: U1.41 U2.2 | length 25.8
  Top Layer w0.3: v1(19.309,52.084) 19.309,52.03 19.209,51.93 19.209,51.085 19.436,50.858 U1.41
  Bottom Layer w0.3: v1(19.309,52.084) 19.336,52.111 19.336,53.124 26.638,60.426 37.09,60.426 37.98,61.316 U2.2
L_A13: U1.39 U2.3 | length 26.5
  Top Layer w0.3: v1(20.409,48.324) 20.436,48.351 U1.39 ; U2.3@38.396,58.742 U2.3
  Bottom Layer w0.3: v1(20.409,48.324) 20.409,52.443 26.574,58.608 38.262,58.608 U2.3
L_A14: U1.36 U2.4 | length 21.7
  Top Layer w0.3: U1.36 21.936,51.053 21.936,54.385 22.936,55.385 23.787,56.236 U2.4
L_A15: U1.34 U2.5 | length 20.3
  Top Layer w0.3: U1.34 22.936,51.467 22.936,53.971 23.85,54.885 29.875,54.885 31.064,53.696 U2.5
L_D0: U1.15 U2.14 | length 17.9
  Top Layer w0.3: U1.15 30.932,43.287 32.549,41.67 32.549,37.636 36.392,33.793 36.392,33.338 37.33,32.399 37.33,31.784 38.278,30.836 U2.14
L_D1: U1.13 U2.15 | length 19.7
  Top Layer w0.3: U1.13 31.026,42.287 31.11,42.203 v1(31.164,42.203) ; v1(34.532,34.698) 34.532,34.685 34.936,34.281 34.936,33.899 36.83,32.005 36.83,30.359 37.308,29.881 37.308,29.222 38.235,28.296 U2.15
  Bottom Layer w0.3: v1(31.164,42.203) 31.218,42.203 31.435,41.986 31.524,41.986 34.359,39.151 34.359,35.518 34.532,35.345 v1(34.532,34.698)
L_D2: U1.17 U2.12 | length 15.6
  Top Layer w0.3: U1.17 31.384,44.287 33.549,42.122 33.549,38.082 34.826,36.806 35.257,36.806 36.147,35.916 U2.12
L_D3: U1.25 U2.8 | length 10.7
  Top Layer w0.3: U1.25 32.177,48.287 34.389,46.076 U2.8
L_D4: U1.28 U2.7 | length 14.6
  Top Layer w0.3: U1.28 25.936,49.183 25.936,49.023 26.086,48.873 v1(26.086,48.287)
  Bottom Layer w0.3: v1(26.086,48.287) 26.556,47.817 37.181,47.817 37.98,48.616 U2.7
L_D5: U1.20 U2.9 | length 10.7
  Top Layer w0.3: U1.20 32.177,45.787 34.429,43.536 U2.9
L_D6: U1.14 U2.10 | length 13.2
  Top Layer w0.3: v1(27.305,42.774) 27.865,42.774 27.879,42.787 U1.14
  Bottom Layer w0.3: v1(27.305,42.774) 29.39,42.774 29.42,42.803 36.173,42.803 37.98,40.996 U2.10
L_D7: U1.16 U2.13 | length 16.5
  Top Layer w0.3: U1.16 31.177,43.787 33.049,41.915 33.049,37.875 37.181,33.744 37.26,33.744 37.628,33.376 U2.13
MREQ: U1.6 U2.19 | length 27
  Top Layer w0.3: v1(26.951,38.417) 26.99,38.456 27.131,38.456 27.463,38.787 U1.6 ; v1(29.405,32.787) 29.405,32.733 29.545,32.593 29.545,32.539 29.927,32.157 29.927,32.016 33.808,28.134 33.808,26.598 34.83,25.577 34.83,24.451 35.83,23.451 35.83,22.325 36.33,21.825 36.33,20.406 36.33,19.992 38.187,18.136 U2.19
  Bottom Layer w0.3: v1(26.951,38.417) 26.951,37.768 29.261,35.458 29.261,32.985 29.405,32.841 v1(29.405,32.787)
N\M\I\: U1.9 U2.17 | length 23.6
  Top Layer w0.3: v1(27.291,40.57) 27.324,40.57 27.607,40.287 U1.9 ; v1(30.938,34.251) 30.976,34.213 30.976,34.065 31.045,33.996 31.045,33.16 35.308,28.897 35.308,27.22 36.33,26.198 36.33,25.072 38.187,23.216 U2.17
  Bottom Layer w0.3: v1(27.291,40.57) 30.907,36.955 30.907,34.282 v1(30.938,34.251)
NetCN1_5: CN1.5 FB6.1 | length 11.4
  Top Layer w0.6: CN1.5 12.497,14.072 FB6.1
NetCN1_6: CN1.6 FB1.1 | length 12.2
  Top Layer w0.6: CN1.6 15.037,12.167 FB1.1
NetCN1_7: CN1.7 FB4.1 | length 13
  Top Layer w0.6: CN1.7 17.577,10.262 FB4.1
NetCN1_12: CN1.12 FB5.1 | length 11.9
  Top Layer w0.6: FB5.1 30.277,12.929 CN1.12
NetCN1_C: CN1.C FB3.1 | length 11.6
  Bottom Layer w0.6: FB3.1 7.417,13.564 CN1.C
NetCN1_E: CN1.E FB2.1 | length 11.9
  Bottom Layer w0.6: FB2.1 12.497,12.929 CN1.E
Phi2: C3.2 FB2.2 U1.23 | length 39.8
  Top Layer w0.3: C3.2 8.306,22.2 8.306,24.674 11.25,27.618 11.25,32.886 25.539,47.176 26.641,47.176 26.752,47.287 U1.23
  Top Layer w0.6: FB2.2 C3.2
R/W\: C15.2 FB6.2 U1.74 | length 21.3
  Top Layer w0.3: v1(12.212,32.283) 13.056,31.44 13.056,26.949 15.298,24.707 15.298,21.953 C15.2 ; v1(12.212,35.077) 12.212,35.132 12.112,35.232 12.112,36.611 12.288,36.787 U1.74
  Top Layer w0.6: FB6.2 C15.2
  Bottom Layer w0.3: v1(12.212,32.283) v1(12.212,35.077)
R\D\: U1.3 U2.21 | length 45.6
  Top Layer w0.3: U1.3 29.861,37.287 30.349,36.799 30.349,35.664 28.436,33.751 28.436,33.374 28.305,33.243 28.305,31.979 32.808,27.476 32.808,26.184 33.83,25.162 33.83,24.037 34.83,23.037 34.83,21.911 35.33,21.411 35.33,19.578 36.33,18.578 36.33,15.619 36.83,15.119 37.504,14.446 37.892,14.446 38.332,14.446 44.487,14.446 45.637,15.596 U2.21
R\E\S\E\T\: C10.2 FB3.2 U1.66 | length 27
  Top Layer w0.3: C10.2 6.891,22.436 6.891,36.481 11.198,40.787 U1.66
  Top Layer w0.6: FB3.2 C10.2
TCK: CN2.3 U1.48 | length 14.2
  Top Layer w0.3: CN2.3 11.994,58.606 15.936,54.664 U1.48
TDI: CN2.5 U1.45 | length 12.7
  Top Layer w0.3: CN2.5 17.074,52.062 17.436,51.7 U1.45
TDO: CN2.4 U1.83 | length 29.6
  Top Layer w0.3: U1.83 18.436,36.267 v1(18.44,36.271)
  Bottom Layer w0.3: CN2.4 16.612,60.482 16.612,49.074 18.425,47.26 18.425,41.819 18.44,41.804 v1(18.44,36.271)
TMS: CN2.2 U1.47 | length 18.9
  Top Layer w0.3: CN2.2 10.654,63.759 12.491,63.759 13.259,62.992 13.259,58.09 16.436,54.912 U1.47
TP4: U1.65
TP5: U1.63
TP10: U1.64
VCC: C1.2 C16.2 CN1.2 CN1.3 CP1.1 U2.11 U5.1 U5.3 | length 94.9
  Top Layer w0.5: U5.1 2.878,43.877 2.678,43.877 2.528,43.727 2.329,43.727 1.978,43.375 1.978,42.578 2.479,42.077 2.678,42.077 2.728,42.027 2.963,42.027 3.013,41.977 3.013,40.141 C16.2
  Top Layer w1: C16.2 3.099,37.735 3.704,37.13 3.704,34.93 5.004,33.63 CP1.1
  Top Layer w1.5: CN1.2 4.877,10.363 ; CP1.1 5.004,27.635 1.88,24.511 1.88,13.36 4.877,10.363 ; CN1.3 7.417,9.296 6.35,10.363 4.877,10.363 ; C1.2 U2.11
  Bottom Layer w1.5: CP1.1 11.997,29.947 14.021,31.97 14.021,33.401 15.297,34.677 24.81,34.677 27.806,31.681 28.723,31.681 28.817,31.587 34.536,31.587 35.732,32.783 35.732,35.7 35.509,35.924 C1.2
W\A\I\T\: U1.8 U2.24 | length 40.3
  Top Layer w0.3: v1(27.137,39.875) 27.191,39.875 27.28,39.787 U1.8 ; v1(30.445,33.747) 30.483,33.709 30.483,33.546 30.545,33.484 30.545,32.953 34.808,28.69 34.808,27.013 35.83,25.991 35.83,24.865 36.83,23.865 36.83,22.739 37.504,22.066 44.759,22.066 45.909,23.216 U2.24
  Bottom Layer w0.3: v1(27.137,39.875) 27.17,39.875 30.338,36.708 30.338,33.908 30.445,33.802 v1(30.445,33.747)
W\R\: U1.4 U2.22 | length 43.8
  Top Layer w0.3: U1.4 30.373,37.787 30.849,37.311 30.849,35.457 28.936,33.544 28.936,33.167 28.805,33.035 28.805,32.186 33.308,27.683 33.308,26.391 34.33,25.37 34.33,24.244 35.33,23.244 35.33,22.118 35.83,21.618 35.83,19.785 36.83,18.785 36.83,17.659 37.504,16.986 44.759,16.986 45.909,18.136 U2.22
Z80-R\E\S\E\T\: U1.12 U2.26 | length 36.3
  Top Layer w0.3: U1.12 29.623,41.787 30.024,41.386 v1(31.276,41.386) ; v1(34.032,33.833) 36.33,31.535 36.33,29.996 36.808,29.518 36.808,27.841 37.504,27.146 41.251,27.146 42.401,28.296 U2.26
  Bottom Layer w0.3: v1(31.276,41.386) 33.859,38.802 33.859,34.522 33.994,34.387 33.994,33.871 v1(34.032,33.833)
pads on no net: CN1.4 CN1.8 CN1.9 CN1.10 CN1.11 CN1.B CN1.D U1.46 U1.49 U1.50 U1.52 U1.53 U1.54 U1.55 U1.56 U1.58 U1.59 U1.60 U1.61 U1.85 U2.18 U2.20 U2.27 U2.28 U5.4

## Polygon pours and split planes (outlines as drawn)
GND on Top Layer "Top Layer - GND" (solid, remove dead copper, pour order 5): 0,1.3 0,64.795 cw(c3.988,64.795) 3.71,68.773 cw(c8.843,74.757) 16.027,78.003 11.684,77.03 ccw(c8.842,74.757) 12.172,73.289 16.275,72.127 cw(c8.842,74.757) 13.977,68.773 18.091,68.773 18.091,82.376 26.076,82.375 cw(c26.12,77.6) 26.12,72.824 22.829,72.824 22.829,68.783 30.687,68.792 33.991,82.608 37.802,82.603 34.437,68.781 39.206,68.781 39.204,82.603 45.231,82.603 47.733,73.127 50.197,82.603 56.262,82.603 56.262,68.101 cw(c54.029,64.801) 58.014,64.795 58.014,1.296 cw(c56.718,1.296) 56.718,0 1.3,0 cw(c1.3,1.3)
GND on Bottom Layer "Bottom Layer - GND" (solid, remove dead copper, pour order 6): 0,1.3 0,64.795 cw(c3.988,64.795) 3.71,68.773 cw(c8.843,74.757) 16.027,78.003 11.684,77.03 ccw(c8.842,74.757) 12.172,73.289 16.275,72.127 cw(c8.842,74.757) 13.977,68.773 18.091,68.773 18.091,82.376 26.076,82.375 cw(c26.12,77.6) 26.12,72.824 22.829,72.824 22.829,68.783 30.687,68.792 33.991,82.608 37.802,82.603 34.437,68.781 39.206,68.781 39.204,82.603 45.231,82.603 47.733,73.127 50.197,82.603 56.262,82.603 56.262,68.101 cw(c54.029,64.801) 58.014,64.795 58.014,1.296 cw(c56.718,1.296) 56.718,0 1.3,0 cw(c1.3,1.3)

## Keep-outs
Top Layer:
  rectangle: 0,0 57.963,4.623
Bottom Layer:
  rectangle: 0,0 57.963,4.623

## Silkscreen, mask and mechanical layers (free items; w line width, h text height)
Top Overlay:
  region: 22.555,73.076 22.555,75.667 24.88,75.667 ccw(c24.468,77.624) 25.081,79.527 22.555,79.527 22.555,82.118 26.348,82.118 cw(c26.123,77.6) 26.12,73.076
  region: 15.933,71.938 cw(c8.866,74.735) 15.633,78.194 11.799,77.304 ccw(c8.866,74.735) 12.349,72.98
  region: 18.415,67.386 18.364,82.118 22.555,82.118 22.555,67.386
  region: 39.522,67.386 39.472,82.347 45.034,82.347 47.704,72.07 50.394,82.347 55.982,82.347 55.982,67.407 52.654,67.407 52.654,78.943 52.202,78.943 49.279,67.408 46.209,67.398 43.289,78.943 42.799,78.943 42.799,67.386
  region: 30.612,67.386 34.188,82.344 37.48,82.344 33.838,67.386
  text "JLCJLCJLCJLC" at 51.293,46.933 h1.5 r90
  text "Z80-Card" at 29.286,9.42 h6
Bottom Overlay:
  drawing of 83 lines, arcs and shapes, not listed
  text "+3.3V" at 6.26,63.856 h2 r270
  text "TMS" at 8.793,63.83 h2 r270
  text "TCK" at 11.333,63.83 h2 r270
  text "TDO" at 13.873,63.83 h2 r270
  text "TDI" at 16.421,63.83 h2 r270
  text "GND" at 18.953,63.83 h2 r270
  text "Version: '.Version' / Revision: '.Revision' / Date: '.Print_Date'" at 54.254,9.332 h2
Board:
  lines w0.1: 3.707,68.773 cw(c8.842,74.757) 16.027,78.003 11.684,77.03 ccw(c8.842,74.757) 12.172,73.289 16.275,72.127 cw(c8.842,74.757) 13.977,68.773 18.091,68.773 18.091,82.376 26.076,82.375 cw(c26.12,77.6) 26.12,72.824 22.829,72.824 22.829,68.783 30.683,68.783 ; 3.71,68.773 ccw(c3.988,64.795) 0,64.795 0,1.3 ccw(c1.3,1.3) 1.3,0 56.718,0 ccw(c56.718,1.296) 58.014,1.296 58.014,64.795 ccw(c54.026,64.795) 56.256,68.101 ; 30.687,68.792 33.991,82.608 37.803,82.608 34.437,68.781 39.206,68.781 ; 39.208,68.779 39.204,82.603 45.231,82.603 47.733,73.127 50.197,82.603 56.262,82.603 56.262,68.101 ; 45.578,68.783 43.071,68.783 43.071,78.699 45.582,68.787 ; 52.389,68.79 49.885,68.79 52.395,78.699 52.395,68.783 ; 22.829,75.928 22.829,79.271 24.519,79.271 cw(c24.535,77.6) 24.535,75.928 22.829,75.928

## Text inside footprints (layer, text, board x,y; h text height)
CP1: Top Overlay "+" at 7.919,31.039 h3 r180; Top Assembly "+" at 7.925,31.039 h3 r180